# Altium PCB PCB.PcbDoc (part 2 of 2)
Units mm, origin at the board's own origin, x right, y up, seen from the top; angles counter-clockwise.
Board outline 200 x 191 mm, 2 copper layers (Top Layer, Bottom Layer); 381 components, 542 nets, 2307 pads, 23 vias.
Unrouted connection lines stored in the file: 1334.
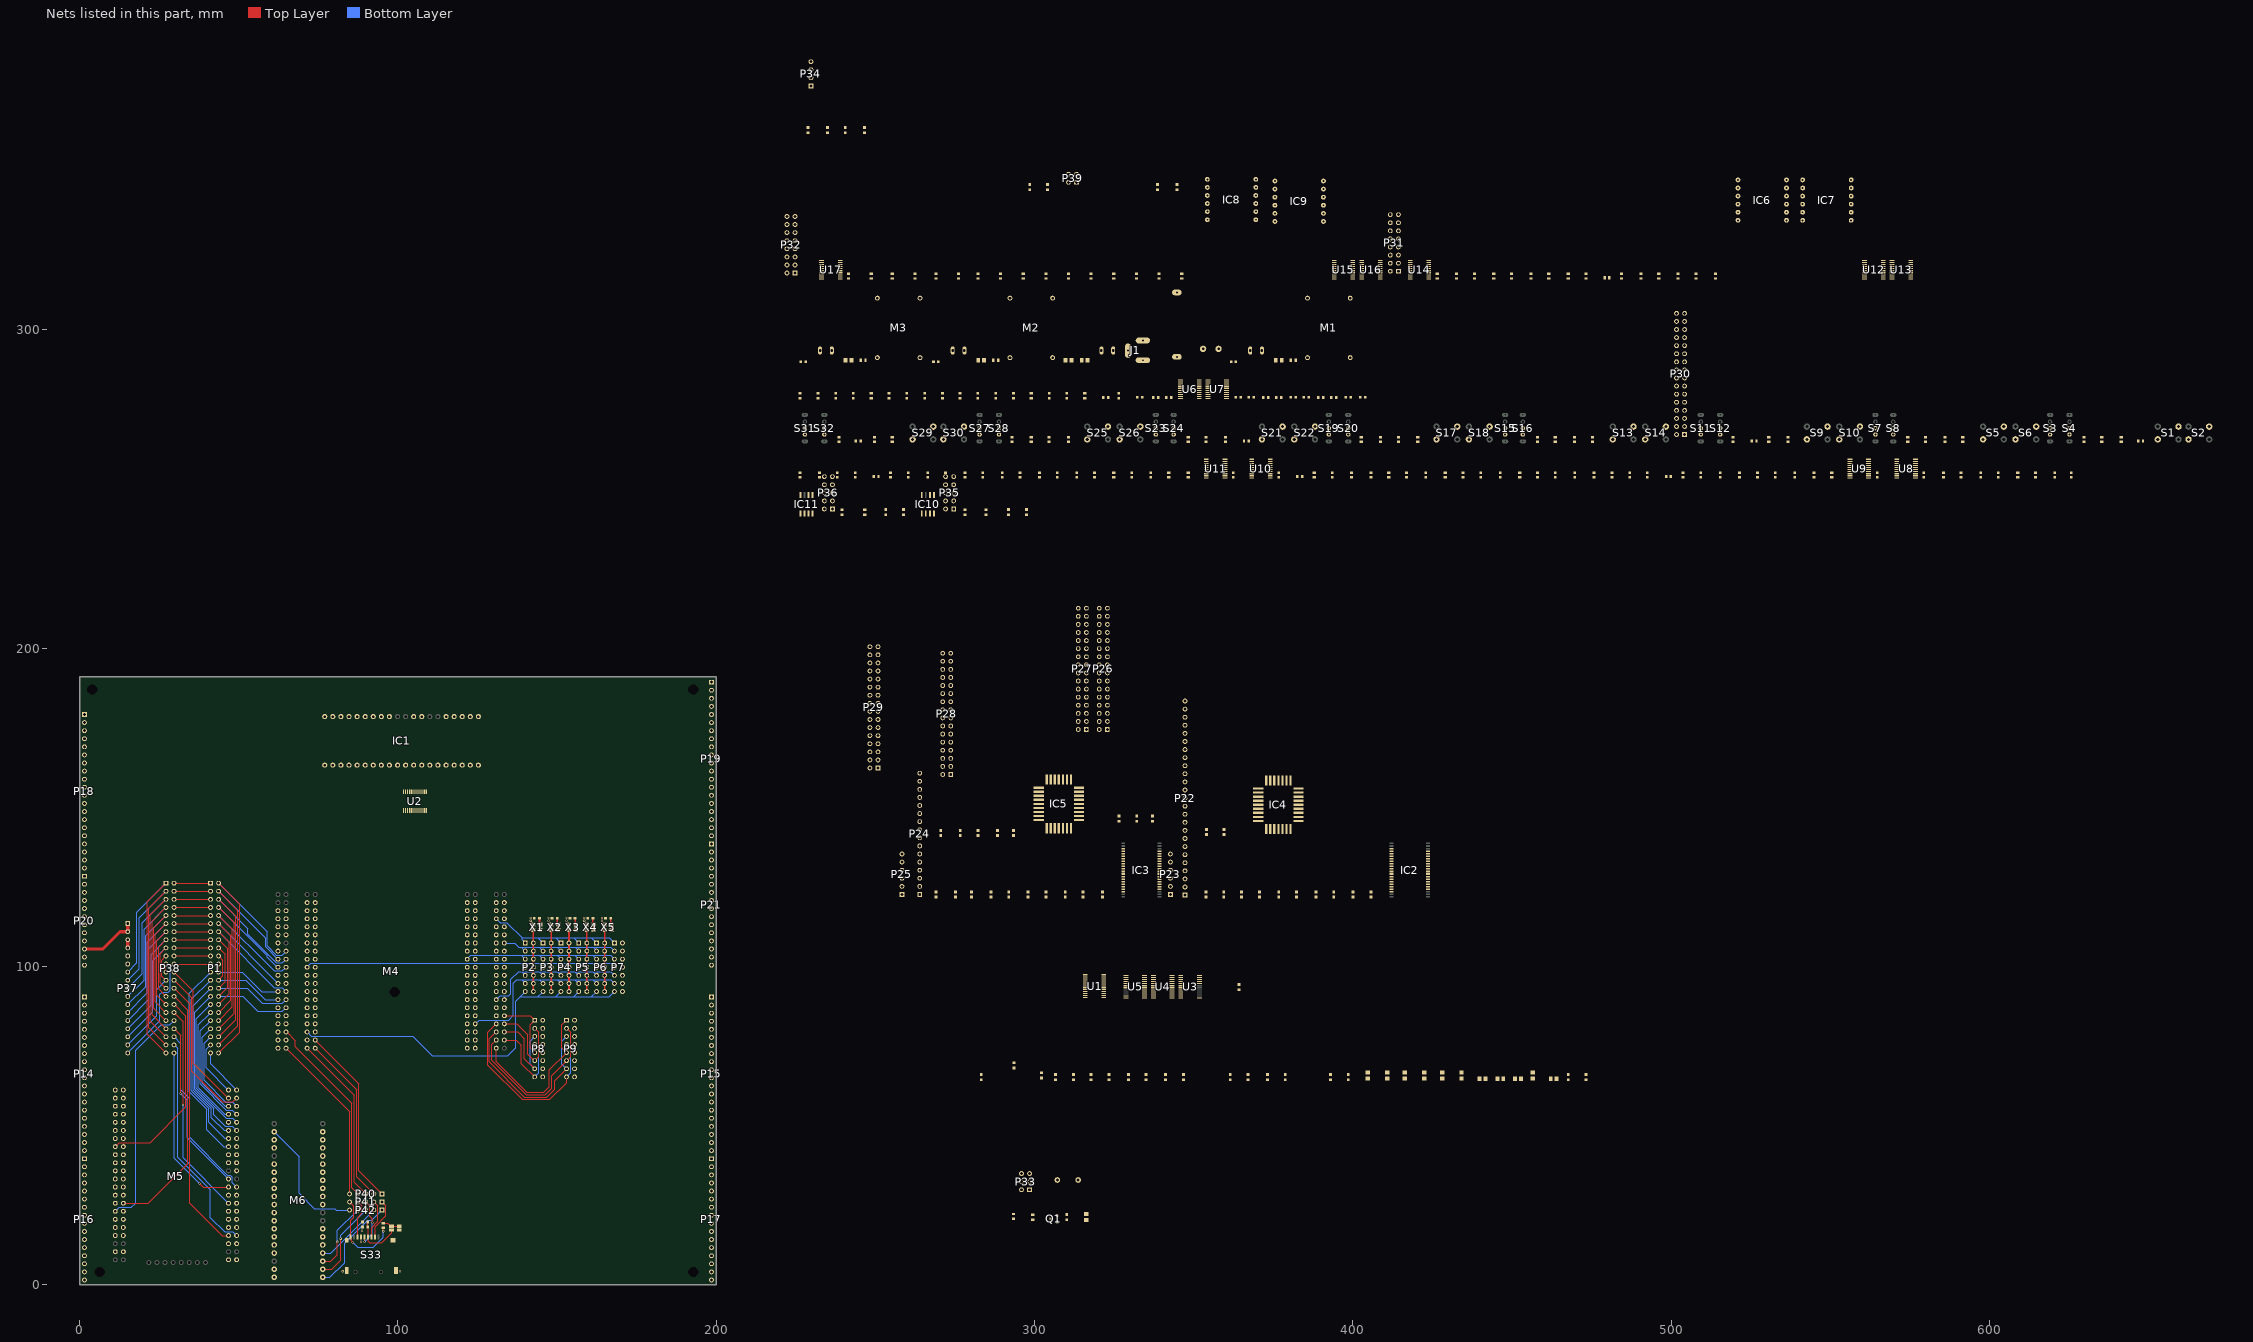
[diagram p2: the nets of this part, all layers, seen from the top]

## Part data
C2 C4 C5 C7 C9 C22 C23 C24 C25 C77: "Multilayer ceramic capacitor", LCSC part=C1711, Package=0805, V=50
C10 C11 C12 C13 C14: library part "Ceramic capacitor", "Multilayer ceramic capacitor", LCSC part=C14663, Package=0603, V=50
C15 C29 C31 C32 C34 C36 C38 C41 C43 C45 C78 C80 C82 C83 C87 C88 C90: "Multilayer ceramic capacitor", LCSC part=C1691, Package=0603, V=6.3
C16 C28 C30 C33 C35 C37 C39 C40 C42 C44 C52 C53 C54 C55 C62 C63 C64 C65 C69 C70 C74 C75 C79 C81 C84 C85 C86 C89 C91: "Multilayer ceramic capacitor", LCSC part=C14663, Package=0603, V=50
C17 C18 C19 C20 C21: "Multilayer ceramic capacitor", LCSC part=C45783, Package=0805, V=25
C26 C27: "Multilayer ceramic capacitor", LCSC part=C1710, Package=0805, V=50
C46 C47 C48 C49 C56 C57 C58 C59 C66 C67 C71 C72 C76: "Multilayer ceramic capacitor", LCSC part=C59461, Package=0603, V=6.3
C50 C51 C60 C61 C68 C73: "Multilayer ceramic capacitor", LCSC part=C1591, Package=0603, V=50
D1 D2 D3: library part LED2, "Green LED 0603", Package=0603
D4 D5 D6 D7 D8 D9 D10 D11 D12 D13 D14 D15 D16 D17 D18 D19 D20 D21 D22 D23 D24 D25 D26 D27 D28 D29 D30 D31 D32 D33 D34 D35 D36 D37 D38 D39 D40 D41 D42 D43 D44 D45 D46 D47 D48 D49 D50 D51: library part LED2, "Red LED 0603", LCSC part=C2286, Package="0603 - 3.2X1.6X1.1"
IC2 IC3: MFR=ISSI, MFR part=IS61WV5128BLL-10TLI, Package="TSOP II - 44pin", Temp="−40 to +85 °C"
IC4 IC5: "Parallel NOR FLASH SST39VF0xx"
IC6 IC7 IC8 IC9: "Seven segment display x 4 digits with 4 decimal points and hours/minutes divider."
IC10 IC11: "NOR flash memory / SPI"
J1: "Low Voltage Power Supply Connector", Publisher="Altium Limited"
LS1: "Magnetic Transducer Buzzer", ComponentLink1Description="Manufacturer Link", ComponentLink1URL=http://www.megastar.com/linecard/buzzmode/index.php, DatasheetVersion=17-Dec-2003, LatestRevisionDate=17-Dec-2003, LatestRevisionNote="Schematic revised, PCB Footprint replaced.", PackageDescription="Magnetic Transducer Buzzer", PackageReference=ABSM-1574, Published=24-Mar-1999, Publisher="Altium Limited"
M1 M2 M3: library part "Module regulable Step Down converter", "Module regulable Step Down converter"
M4: library part Lattice_MachXO3LF_starter_kit, "FPGA development board - MachXO3LF Starter Kit"
M5: "Module DevEBox STM32H7XX_M  / V2.0  / SN: 1907"
M6: "Module Black Pill V3.0 / STM32F4xx"
P1 P38: "Header, 22-Pin, Dual row", LatestRevisionDate=17-Jul-2002, LatestRevisionNote="Re-released for DXP Platform.", Publisher="Altium Limited"
P2 P3 P4 P5 P6 P7: "Header, 7-Pin, Dual row", LatestRevisionDate=17-Jul-2002, LatestRevisionNote="Re-released for DXP Platform.", Publisher="Altium Limited"
P8 P9 P31 P32: "Header, 8-Pin, Dual row", LatestRevisionDate=17-Jul-2002, LatestRevisionNote="Re-released for DXP Platform.", Publisher="Altium Limited"
P14 P15 P18 P19: "Header, 20-Pin", LatestRevisionDate=17-Jul-2002, LatestRevisionNote="Re-released for DXP Platform.", Publisher="Altium Limited"
P16 P17 P21 P24: "Header, 16-Pin", LatestRevisionDate=17-Jul-2002, LatestRevisionNote="Re-released for DXP Platform.", Publisher="Altium Limited"
P20: "Header, 12-Pin", LatestRevisionDate=17-Jul-2002, LatestRevisionNote="Re-released for DXP Platform.", Publisher="Altium Limited"
P22: "Header, 25-Pin", LatestRevisionDate=17-Jul-2002, LatestRevisionNote="Re-released for DXP Platform.", Publisher="Altium Limited"
P23 P25: "Header, 6-Pin", LatestRevisionDate=17-Jul-2002, LatestRevisionNote="Re-released for DXP Platform.", Publisher="Altium Limited"
P26 P27 P28 P29 P30: "Header, 16-Pin, Dual row", LatestRevisionDate=17-Jul-2002, LatestRevisionNote="Re-released for DXP Platform.", Publisher="Altium Limited"
P33: "Header, 3-Pin, Dual row", LatestRevisionDate=17-Jul-2002, LatestRevisionNote="Re-released for DXP Platform.", Publisher="Altium Limited"
P34: "Header, 4-Pin", LatestRevisionDate=17-Jul-2002, LatestRevisionNote="Re-released for DXP Platform.", Publisher="Altium Limited"
P35 P36: "Header, 5-Pin, Dual row", LatestRevisionDate=17-Jul-2002, LatestRevisionNote="Re-released for DXP Platform.", Publisher="Altium Limited"
P37: "Header, 17-Pin", LatestRevisionDate=17-Jul-2002, LatestRevisionNote="Re-released for DXP Platform.", Publisher="Altium Limited"
P39: "Header, 2-Pin, Dual row", LatestRevisionDate=17-Jul-2002, LatestRevisionNote="Re-released for DXP Platform.", Publisher="Altium Limited"
P40 P41 P42: "Header, 5-Pin", LatestRevisionDate=17-Jul-2002, LatestRevisionNote="Re-released for DXP Platform.", Publisher="Altium Limited"
Q1: library part MOSFET-N, "N-Channel MOSFET", LCSC part=C20917, MFR="Alpha & Omega Semicon", Package=SOT-23-3L, MFR part=AO3400A
R1 R2 R3 R20 R21 R22 R23 R24 R25 R26 R27 R28 R29 R30 R31 R32 R33 R34 R35 R36 R37 R38 R39 R40 R41 R42 R43 R44 R45 R46 R47 R48 R49 R50 R51 R84 R85 R86 R87 R88 R89 R90 R91 R92 R93 R94 R95 R96 R97 R98 R99 R100 R101 R102 R103 R104 R105 R106 R107 R108 R109 R110 R111 R112 R113 R114 R115 R116 R117 R118 R119 R120 R121 R122: Package=0603
R4 R5 R6 R7 R8 R9 R10 R11 R12 R13 R14 R15 R16 R17 R18 R19 R52 R53 R54 R55 R56 R57 R58 R59 R60 R61 R62 R63 R64 R65 R66 R67 R68 R69 R70 R71 R72 R73 R74 R75 R76 R77 R78 R79 R80 R81 R82 R83: LCSC part=C22843, Package=0603
S1 S2 S5 S6 S9 S10 S13 S14 S17 S18 S21 S22 S25 S26 S29 S30: library part SW-PB, "Switch"
S3 S4 S7 S8 S11 S12 S15 S16 S19 S20 S23 S24 S27 S28 S31 S32: "SPDT Subminiature Toggle Switch, Right Angle Mounting, Vertical Actuation", ComponentLink1Description="Manufacturer Link", ComponentLink1URL=http://www.apem.com, DatasheetVersion=05-Dec-2000, LatestRevisionDate=17-Dec-2003, LatestRevisionNote="Schematic revised, PCB Footprint replaced.", PackageDescription="Switch; 4 Leads", PackageReference=TL36WW15050, Published=24-Mar-1999, Publisher="Altium Limited"
S33: library part "Micro SD", "Micro SD memory"
SJ1 SJ2: "Normally open solder jumper"
U1 U2 U3 U4 U5: "Octal Bus Transceiver And 3.3-V To 5-V Shifter With 3-State Outputs 24-TSSOP -40 to 85", Manufacturer_Name="Texas Instruments", Copyright="Copyright (C) 2025 Ultra Librarian. All rights reserved.", Manufacturer_Part_Number=SN74LVC4245APW, RefDes=RefDes, Type=Type
U6 U7 U8 U9 U10 U11 U12 U13 U14 U15 U16 U17: "8-ch, 1.65-V to 3.6-V buffers with 3-state outputs 20-TSSOP -40 to 125", Manufacturer_Name="Texas Instruments", Copyright="Copyright (C) 2026 Ultra Librarian. All rights reserved.", Datasheet=https://www.ti.com/lit/gpn/sn74lvc244a, Manufacturer_Part_Number=SN74LVC244APWR, RefDes=RefDes, Type=Type
X1 X2 X3 X4 X5: library part "Active oscillator"

## Free pads (board coordinates)
  round 1.524 hole 3.2 unplated: 2(4,187) 2(6.3,4) 2(99,92) 2(192.754,4) 2(192.754,187)

## Via types
v1: diameter 0.7, hole 0.3, Top Layer to Bottom Layer, tented both sides, 23 vias

## Nets (pads, with @x,y where several pads share a name; then routed paths per layer and width w, separated by ;. In a path a pad name is that pad's centre, name@x,y a point inside that pad or via, vN(x,y) a via of type N, cw(c..) or ccw(c..) an arc to the next point about the centre after c; other vN are vias at no path point)
A0_BIOS1: IC4.12 P27.30
A0_BIOS2: IC5.12 P29.30
A0_latch_3v: M4.J6_10 M5.J3_44 P19.20 U8.8
A1_BIOS1: IC4.11 P27.28
A1_BIOS2: IC5.11 P29.28
A1_latch_3v: IC2.3 IC3.3 M4.J6_7 M5.J3_43 P19.3 P22.25 P27.29 P29.29 U8.6
A2_BIOS1: IC4.10 P27.26
A2_BIOS2: IC5.10 P29.26
A2_latch_3v: IC2.4 IC3.4 M4.J6_14 M5.J3_42 P21.1 P22.24 P27.27 P29.27 U8.4
A3_BIOS1: IC4.9 P27.24
A3_BIOS2: IC5.9 P29.24
A3_latch_3v: IC2.5 IC3.5 M4.J6_9 M5.J3_41 P19.4 P22.23 P27.25 P29.25 U8.2
A4_BIOS1: IC4.8 P27.22
A4_BIOS2: IC5.8 P29.22
A4_latch_3v: IC2.6 IC3.6 M4.J6_16 M5.J3_40 P21.2 P22.22 P27.23 P29.23 U11.17
A5_BIOS1: IC4.7 P27.20
A5_BIOS2: IC5.7 P29.20
A5_latch_3v: IC2.7 IC3.7 M4.J6_13 M5.J3_39 P19.5 P22.21 P27.21 P29.21 U11.15
A6_BIOS1: IC4.6 P27.18
A6_BIOS2: IC5.6 P29.18
A6_latch_3v: IC2.16 IC3.16 M4.J6_18 M5.J3_38 P21.3 P22.20 P27.19 P29.19 U11.13
A7_BIOS1: IC4.5 P27.16
A7_BIOS2: IC5.5 P29.16
A7_latch_3v: IC2.17 IC3.17 M4.J6_15 M5.J3_37 P19.6 P22.19 P27.17 P29.17 U11.11
A8_BIOS1: IC4.27 P26.5
A8_BIOS2: IC5.27 P28.5
A8_latch_3v: IC2.18 IC3.18 M4.J6_20 M5.J3_36 P21.4 P22.18 P27.15 P29.15 U11.8
A9_BIOS1: IC4.26 P26.7
A9_BIOS2: IC5.26 P28.7
A9_latch_3v: IC2.19 IC3.19 M4.J6_19 M5.J3_35 P19.8 P22.17 P26.6 P28.6 U11.6
A10_BIOS1: IC4.23 P26.13
A10_BIOS2: IC5.23 P28.13
A10_latch_3v: IC2.20 IC3.20 M4.J6_24 M5.J3_34 P21.5 P22.16 P26.8 P28.8 U11.4
A11_BIOS1: IC4.25 P26.9
A11_BIOS2: IC5.25 P28.9
A11_latch_3v: IC2.26 IC3.26 M4.J6_23 M5.J3_33 P19.9 P22.15 P26.14 P28.14 U11.2
A12_BIOS1: IC4.4 P27.14
A12_BIOS2: IC5.4 P29.14
A12_latch_3v: IC2.27 IC3.27 M4.J6_26 M5.J3_32 P21.6 P22.14 P26.10 P28.10 U9.17
A13_BIOS1: IC4.28 P26.3
A13_BIOS2: IC5.28 P28.3
A13_latch_3v: IC2.28 IC3.28 M4.J6_25 M5.J3_31 P19.10 P22.13 P27.13 P29.13 U9.15
A14_BIOS1: IC4.29 P26.1
A14_BIOS2: IC5.29 P28.1
A14_latch_3v: IC2.29 IC3.29 M4.J6_28 M5.J3_29 P21.7 P22.12 P26.4 P28.4 U9.13
A15_BIOS1: IC4.3 P27.12
A15_BIOS2: IC5.3 P29.12
A15_latch_3v: IC2.30 IC3.30 M4.J6_27 M5.J3_28 P19.11 P22.11 P26.2 P28.2 U9.11
A16: IC1.38 U1.3
A16_3v: M4.J8_6 P15.18 U1.21
A16_BIOS1: IC4.2 P27.10
A16_BIOS2: IC5.2 P29.10
A16_latch_3v: IC2.38 IC3.38 M4.J6_30 M5.J3_27 P21.8 P22.10 P27.11 P29.11 U9.8
A17: IC1.37 U1.4
A17_3v: M4.J8_8 P15.19 U1.20
A17_BIOS1: IC4.30 P27.2
A17_BIOS2: IC5.30 P29.2
A17_latch_3v: IC2.39 IC3.39 M4.J6_29 M5.J3_26 P19.12 P22.9 P27.9 P29.9 U9.6
A18: IC1.36 U1.5
A18_3v: M4.J8_10 P15.20 U1.19
A18_BIOS1: IC4.1 P27.8
A18_BIOS2: IC5.1 P29.8
A18_latch_3v: IC2.40 IC3.40 M4.J6_36 M5.J3_25 P21.10 P22.8 P27.1 P29.1 U9.4
A19: IC1.35 U1.6
A19_3v: M4.J8_16 P17.2 U1.18
A19_latch_3v: IC2.41 IC3.41 M4.J6_33 M5.J3_23 P19.13 P22.7 P27.7 P29.7 U9.2
AD0: IC1.16 U2.3
AD0_3v: IC3.9 M4.J8_30 M5.J3_22 P17.8 P24.16 P29.31 P30.31 U2.21 U7.17
AD0_3v_sw: P30.32 R49.1
AD1: IC1.15 U2.4
AD1_3v: IC3.10 M4.J8_18 M5.J3_21 P17.3 P17.9 P24.15 P28.32 P30.29 U2.20 U7.15
AD1_3v_sw: P30.30 R45.1
AD2: IC1.14 U2.5
AD2_3v: IC3.13 M4.J8_29 M5.J3_20 P15.12 P24.14 P28.30 P30.27 U2.19 U7.13
AD2_3v_sw: P30.28 R41.1
AD3: IC1.13 U2.6
AD3_3v: IC3.14 M4.J8_25 M5.J3_19 P15.10 P24.13 P28.26 P30.25 U2.18 U7.11
AD3_3v_sw: P30.26 R37.1
AD4: IC1.12 U2.7
AD4_3v: IC3.31 M4.J8_23 M5.J3_18 P15.9 P24.12 P28.24 P30.23 U2.17 U7.8
AD4_3v_sw: P30.24 R33.1
AD5: IC1.11 U2.8
AD5_3v: IC3.32 M4.J8_24 M5.J3_17 P17.5 P24.11 P28.22 P30.21 U2.16 U7.6
AD5_3v_sw: P30.22 R29.1
AD6: IC1.10 U2.9
AD6_3v: IC3.35 M4.J8_19 M5.J3_16 P15.8 P24.10 P28.20 P30.19 U2.15 U7.4
AD6_3v_sw: P30.20 R25.1
AD7: IC1.9 U2.10
AD7_3v: IC3.36 M4.J8_17 M5.J3_13 P15.7 P24.9 P28.18 P30.17 U2.14 U7.2
AD7_3v_sw: P30.18 R21.1
AD8: IC1.8 U4.3
AD8_3v: IC2.9 M4.J8_15 M5.J3_12 P15.6 P24.8 P27.31 P30.15 U4.21 U6.17
AD8_3v_sw: P30.16 R48.1
AD9: IC1.7 U4.4
AD9_3v: IC2.10 M4.J8_13 M5.J3_11 P15.5 P24.7 P26.32 P30.13 U4.20 U6.15
AD9_3v_sw: P30.14 R44.1
AD10: IC1.6 U4.5
AD10_3v: IC2.13 M4.J8_9 M5.J2_10 P15.4 P24.6 P26.30 P30.11 U4.19 U6.13
AD10_3v_sw: P30.12 R40.1
AD11: IC1.5 U4.6
AD11_3v: IC2.14 M4.J8_5 M5.J2_9 P15.2 P24.5 P26.26 P30.9 U4.18 U6.11
AD11_3v_sw: P30.10 R36.1
AD12: IC1.4 U4.7
AD12_3v: IC2.31 M4.J8_3 M5.J2_12 P15.1 P24.4 P26.24 P30.7 U4.17 U6.8
AD12_3v_sw: P30.8 R32.1
AD13: IC1.3 U4.8
AD13_3v: IC2.32 M4.J6_4 M5.J2_11 P19.17 P24.3 P26.22 P30.5 U4.16 U6.6
AD13_3v_sw: P30.6 R28.1
AD14: IC1.2 U4.9
AD14_3v: IC2.35 M4.J6_3 M5.J2_14 P19.1 P24.2 P26.20 P30.3 U4.15 U6.4
AD14_3v_sw: P30.4 R24.1
AD15: IC1.39 U4.10
AD15_3v: IC2.36 M4.J8_4 M5.J2_15 P15.17 P24.1 P26.18 P30.1 U4.14 U6.2
AD15_3v_sw: P30.2 R20.1
ALE: IC1.25 U3.3
ALE_3v_PCLKT5_0: M4.J8_28 M5.J2_13 P17.7 U3.21 U10.11
B\H\E\: IC1.34 U1.7
B\H\E\_3v: P8.2 U1.17 U10.6
B\H\E\_latch_3v: M4.J6_8 P19.19
BIOS_C\E\_high_byte: P22.3 P26.16 U8.15
BIOS_C\E\_low_byte: P22.4 P28.16 U8.17
C\E\_BIOS1: IC4.22 P26.15
C\E\_BIOS2: IC5.22 P28.15
CPU_CLK: IC1.19 U5.5
CPU_CLK_3v: P9.4 U5.19
CPU_RESET: IC1.21 U5.4
CPU_RESET_3v: P8.8 U5.20
D0_BIOS1: IC4.13 P27.32
D0_BIOS2: IC5.13 P29.32
D1_BIOS1: IC4.14 P26.31
D1_BIOS2: IC5.14 P28.31
D2_BIOS1: IC4.15 P26.29
D2_BIOS2: IC5.15 P28.29
D3_BIOS1: IC4.17 P26.25
D3_BIOS2: IC5.17 P28.25
D4_BIOS1: IC4.18 P26.23
D4_BIOS2: IC5.18 P28.23
D5_BIOS1: IC4.19 P26.21
D5_BIOS2: IC5.19 P28.21
D6_BIOS1: IC4.20 P26.19
D6_BIOS2: IC5.20 P28.19
D7_BIOS1: IC4.21 P26.17
D7_BIOS2: IC5.21 P28.17
FPGA1_MCU_STM32H750: M5.J2_30 P1.23 | length 63.5
  Bottom Layer w0.254: P1.23@41.131,98.235 34.5,91.603 34.5,60.7 40,55.2 40,48.7 45.28,43.42 M5.J2_30@46.77,43.42
FPGA2_MCU_STM32H750: M5.J2_32 P1.25 | length 57.7
  Bottom Layer w0.254: P1.25@41.131,95.695 35.1,89.663 35.1,60.9 40.6,55.4 40.6,51 45.627,45.973 46.757,45.973 M5.J2_32@46.77,45.96
FPGA3_MCU_STM32H750: M5.J2_34 P1.27 | length 52.3
  Bottom Layer w0.254: P1.27@41.131,93.155 35.7,87.723 35.7,61.1 41.4,55.4 41.4,52.5 45.4,48.5 M5.J2_34@46.77,48.5
FPGA4_MCU_STM32H750: M5.J2_33 P1.29 | length 50.9
  Bottom Layer w0.254: P1.29@41.131,90.615 36.208,85.691 36.208,61.392 42.1,55.5 42.1,53.5 45.8,49.8 48.01,49.8 M5.J2_33@49.31,48.5
FPGA5_MCU_STM32H750: M5.J2_35 P1.31 | length 45.2
  Bottom Layer w0.254: P1.31@41.131,88.075 36.716,83.659 36.716,61.684 46.1,52.3 48.05,52.3 M5.J2_35@49.31,51.04
FPGA6_MCU_STM32H750: M5.J2_38 P1.33 | length 38.1
  Bottom Layer w0.254: P1.33@41.131,85.535 37.3,81.703 37.3,61.9 45.62,53.58 M5.J2_38@46.77,53.58
FPGA7_MCU_STM32H750: M5.J2_37 P1.35 | length 36.6
  Bottom Layer w0.254: P1.35@41.131,82.995 37.9,79.763 37.9,63.1 46.1,54.9 47.99,54.9 M5.J2_37@49.31,53.58
FPGA8_MCU_STM32H750: M5.J2_40 P1.37 | length 29.5
  Bottom Layer w0.254: P1.37@41.131,80.455 38.5,77.823 38.5,63.3 45.68,56.12 M5.J2_40@46.77,56.12
FPGA9_MCU_STM32H750: M5.J2_39 P1.39 | length 28.1
  Bottom Layer w0.254: P1.39@41.131,77.915 39.1,75.883 39.1,64.2 45.9,57.4 48.03,57.4 M5.J2_39@49.31,56.12
FPGA10_MCU_STM32H750: M5.J2_44 P1.41 | length 17.6
  Bottom Layer w0.254: P1.41@41.131,75.375 39.8,74.043 39.8,68.17 M5.J2_44@46.77,61.2
FPGA11_MCU_STM32H750: M5.J2_43 P1.43 | length 15
  Bottom Layer w0.254: P1.43@41.131,72.835 41.131,69.379 M5.J2_43@49.31,61.2
FPGA-LCD_BACKLIGHT_PWM: P1.21 P38.22 | length 11.5
  Top Layer w0.254: P38.22@29.671,100.775 P1.21@41.131,100.775
FPGA-LCD_BLUE_BIT6: P1.1 P38.2 | length 11.5
  Top Layer w0.254: P38.2@29.671,126.175 P1.1@41.131,126.175
FPGA-LCD_BLUE_BIT7: P1.3 P38.4 | length 11.5
  Top Layer w0.254: P38.4@29.671,123.635 P1.3@41.131,123.635
FPGA-LCD_DE-FPC_PIN9: P1.7 P38.8 | length 11.5
  Top Layer w0.254: P38.8@29.671,118.555 P1.7@41.131,118.555
FPGA-LCD_HSYNC-FPC_PIN11: P1.11 P38.12 | length 11.5
  Top Layer w0.254: P38.12@29.671,113.475 P1.11@41.131,113.475
FPGA-LCD_MODE-FPC_PIN8: P1.5 P38.6 | length 11.5
  Top Layer w0.254: P38.6@29.671,121.095 P1.5@41.131,121.095
FPGA-LCD_PCLK-FPC_PIN37: P1.13 P38.14 | length 11.5
  Top Layer w0.254: P38.14@29.671,110.935 P1.13@41.131,110.935
FPGA-LCD_RESET-FPC_PIN44: P1.19 P38.20 | length 11.5
  Top Layer w0.254: P38.20@29.671,103.315 P1.19@41.131,103.315
FPGA-LCD_SHLR-FPC_PIN39: P1.15 P38.16 | length 11.5
  Top Layer w0.254: P38.16@29.671,108.395 P1.15@41.131,108.395
FPGA-LCD_UPDN-FPC_PIN40: P1.17 P38.18 | length 11.5
  Top Layer w0.254: P38.18@29.671,105.855 P1.17@41.131,105.855
FPGA-LCD_VSYNC-FPC_PIN10: P1.9 P38.10 | length 11.5
  Top Layer w0.254: P38.10@29.671,116.015 P1.9@41.131,116.015
GND: C1.2 C2.2 C3.2 C4.2 C5.2 C6.2 C7.2 C8.2 C9.2 C10.1 C11.1 C12.1 C13.1 C14.1 C15.1 C16.1 C17.1 C18.1 C19.1 C20.1 C21.1 C22.2 C23.2 C24.2 C25.2 C26.2 C27.2 C28.1 C29.1 C30.1 C31.1 C32.1 C33.1 C34.1 C35.1 C36.1 C37.1 C38.1 C39.1 C40.1 C41.1 C42.1 C43.1 C44.1 C45.1 C46.1 C47.1 C48.1 C49.1 C50.1 C51.1 C52.1 C53.1 C54.1 C55.1 C56.1 C57.1 C58.1 C59.1 C60.1 C61.1 C62.1 C63.1 C64.1 C65.1 C66.1 C67.1 C68.1 C69.1 C70.1 C71.1 C72.1 C73.1 C74.1 C75.1 C76.1 C77.2 C78.1 C79.1 C80.1 C81.1 C82.1 C83.1 C84.1 C85.1 C86.1 C87.1 C88.1 C89.1 C90.1 C91.1 D1.2 D2.2 D3.2 IC1.1 IC1.20 IC2.12 IC2.34 IC3.12 IC3.34 IC4.16 IC5.16 IC10.4 IC11.4 J1.2 J1.3 M1.1 M1.4 M2.1 M2.4 M3.1 M3.4 M4.J3_11 M4.J3_12 M4.J3_21 M4.J3_22 M4.J3_31 M4.J3_32 M4.J3_39 M4.J4_11 M4.J4_12 M4.J4_21 M4.J4_22 M4.J4_31 M4.J4_32 M4.J6_11 M4.J6_12 M4.J6_21 M4.J6_22 M4.J6_31 M4.J6_32 M4.J8_11 M4.J8_12 M4.J8_21 M4.J8_22 M4.J8_31 M5.J2_5 M5.J2_6 M5.J3_3 M5.J3_4 M6.19 M6.39 P7.2 P7.4 P7.6 P7.8 P7.10 P7.12 P7.14 P16.15 P16.16 P17.15 P17.16 P20.11 P20.12 P21.15 P21.16 P23.1 P23.2 P23.3 P23.4 P23.5 P23.6 P25.1 P25.2 P25.3 P25.4 P25.5 P25.6 P26.27 P26.28 P28.27 P28.28 P34.4 P37.5 P37.6 Q1.2 R4.1 R5.1 R6.1 R7.1 R8.1 R9.1 R10.1 R11.1 R12.1 R13.1 R14.1 R15.1 R16.1 R17.1 R18.1 R19.1 R22.2 R23.2 R26.2 R27.2 R30.2 R31.2 R34.2 R35.2 R38.2 R39.2 R42.2 R43.2 R46.2 R47.2 R50.2 R51.2 R52.1 R53.1 R54.1 R55.1 R56.1 R57.1 R58.1 R59.1 R60.1 R61.1 R62.1 R63.1 R64.1 R65.1 R66.1 R67.1 R68.1 R69.1 R70.1 R71.1 R72.1 R73.1 R74.1 R75.1 R76.1 R77.1 R78.1 R79.1 R80.1 R81.1 R82.1 R83.1 R117.2 S33.6 S33.10 SJ2.1 U1.11 U1.12 U1.13 U1.22 U2.11 U2.12 U2.13 U3.5 U3.6 U3.7 U3.8 U3.9 U3.10 U3.11 U3.12 U3.13 U3.22 U4.11 U4.12 U4.13 U5.2 U5.11 U5.12 U5.13 U5.14 U5.15 U5.16 U5.22 U6.1 U6.10 U6.19 U7.1 U7.10 U7.19 U8.1 U8.10 U8.19 U9.1 U9.10 U9.19 U10.1 U10.10 U10.19 U11.1 U11.10 U11.19 U12.1 U12.10 U12.19 U13.1 U13.10 U13.19 U14.1 U14.10 U14.19 U15.1 U15.10 U15.19 U16.1 U16.10 U16.19 U17.1 U17.10 U17.19 X1.2 X2.2 X3.2 X4.2 X5.2
  other v1: 82.65,4.275 100.65,4.275 88.4,13.525 88.75,17 141.725,114.375 147.325,114.375 152.925,114.375 158.525,114.375 164.125,114.375 141.725,115.25 147.325,115.25 152.925,115.25 158.525,115.25 164.125,115.25
I\N\T\A\: IC1.24 U3.4
I\N\T\A\_3v: P9.2 U3.20
INTR: IC1.18 U5.6
INTR_3v: P9.6 U5.18 U10.15
IO_A3: M4.J3_40 P20.8 P40.5 | length 54.1
  Top Layer w0.254: M4.J3_40@64.856,74.36 84.82,54.396 P40.5@84.82,28.565
IO_A4: M4.J3_38 P20.7 P33.1
IO_A5: M4.J3_36 P20.6 P40.4 | length 60.3
  Top Layer w0.254: M4.J3_36@64.856,79.44 65.06,79.44 67.75,76.75 67.75,74.75 85.5,57 85.5,30.425 P40.4@87.36,28.565
IO_A10: M4.J3_27 P1.20 P1.26 P18.10 U14.4 | length 29.9
  Top Layer w0.254: P1.26@43.671,95.695 45,97.023 45,101.986 P1.20@43.671,103.315
  Bottom Layer w0.254: P1.26@43.671,95.695 52.205,95.695 58.3,89.6 M4.J3_27@62.316,89.6
IO_B1: M4.J8_35 P9.5 P9.13 P15.14 | length 55.7
  Top Layer w0.16: M4.J8_35@130.896,79.44 128.75,77.294 128.75,70 139.75,59 146.75,59 149.25,61.5 149.25,64.17 P9.13@152.96,67.88
  Bottom Layer w0.16: P9.13@152.96,67.88 151.5,69.34 151.5,76.58 P9.5@152.96,78.04
IO_B4: M4.J3_37 P18.14 U14.13
IO_B5: M4.J3_35 P18.13 U14.11
IO_B6: M4.J3_33 P18.12 U14.8
IO_B7: M4.J3_34 P20.5 U15.2
IO_B9: M4.J3_30 P1.16 P1.30 P20.4 U13.17 | length 43.7
  Top Layer w0.254: P1.30@43.671,90.615 46.5,93.443 46.5,105.566 P1.16@43.671,108.395
  Bottom Layer w0.254: P1.30@43.671,90.615 51.197,90.615 55.911,85.9 63.696,85.9 M4.J3_30@64.856,87.06
IO_B12: M4.J3_6 P18.15 U14.15
IO_B16: M4.J4_40 P16.12 P40.2 | length 53.4
  Top Layer w0.254: M4.J4_40@74,74.36 87,61.36 87,34.005 P40.2@92.44,28.565
IO_C1: M4.J8_33 P9.7 P9.15 P15.13 | length 58.5
  Top Layer w0.16: M4.J8_33@130.896,81.98 128.25,79.334 128.25,69 139,58.25 147.75,58.25 152.96,63.46 P9.15@152.96,65.34
  Bottom Layer w0.16: P9.15@152.96,65.34 154.25,66.63 154.25,74.21 P9.7@152.96,75.5
IO_C2: M4.J8_32 P8.1 P8.9 | length 21.5
  Top Layer w0.16: M4.J8_32@133.436,84.52 141.56,84.52 P8.1@142.96,83.12 141.5,81.66 141.5,74.42 P8.9@142.96,72.96
IO_C4: M4.J3_26 P1.14 P1.32 P20.2 U13.13 | length 54.6
  Top Layer w0.254: P1.32@43.671,88.075 47.008,91.411 47.008,107.598 P1.14@43.671,110.935
  Bottom Layer w0.254: P1.14@43.671,110.935 61.206,93.4 63.596,93.4 M4.J3_26@64.856,92.14
IO_C5: M4.J3_23 P1.12 P1.34 P18.8 U12.17 | length 57.6
  Top Layer w0.254: P1.34@43.671,85.535 47.516,89.379 47.516,109.63 P1.12@43.671,113.475
  Bottom Layer w0.254: P1.12@43.671,113.475 43.671,113.4 62.316,94.755 M4.J3_23@62.316,94.68
IO_C7: M4.J3_20 P1.10 P1.36 P18.20 U13.8 | length 65.5
  Top Layer w0.254: P1.36@43.671,82.995 48.024,87.347 48.024,111.662 P1.10@43.671,116.015
  Bottom Layer w0.254: P1.10@43.671,116.015 61.069,98.617 63.713,98.617 M4.J3_20@64.856,99.76
IO_C12: M4.J3_7 M5.J2_25 P18.2 U12.4
IO_C15: M4.J4_36 P16.10 P39.2
IO_D3: M4.J8_36 P8.5 P8.13 P17.11 | length 29.3
  Top Layer w0.16: M4.J8_36@133.436,79.44 137.56,79.44 139.75,77.25 139.75,71.09 P8.13@142.96,67.88
  Bottom Layer w0.16: P8.13@142.96,67.88 141.5,69.34 141.5,76.58 P8.5@142.96,78.04
IO_D6: M4.J3_24 P20.1 U13.11
IO_D7: M4.J3_19 P1.8 P1.38 P18.7 U12.15 | length 68.8
  Top Layer w0.254: P1.38@43.671,80.455 48.532,85.315 48.532,113.694 P1.8@43.671,118.555
  Bottom Layer w0.254: P1.8@43.671,118.555 58.9,103.326 58.9,102.9 62.04,99.76 M4.J3_19@62.316,99.76
IO_D8: M4.J3_18 P1.6 P1.40 P18.19 U13.6 | length 78.6
  Top Layer w0.254: P1.40@43.671,77.915 49.04,83.283 49.04,115.726 P1.6@43.671,121.095
  Bottom Layer w0.254: P1.6@43.671,121.095 52.876,111.89 52.876,110.123 61.843,101.157 63.713,101.157 M4.J3_18@64.856,102.3
IO_D9: M4.J3_29 P18.11 U14.6
IO_D10: M4.J3_10 M5.J2_28 P18.17 U13.2
IO_D14: M4.J4_37 M6.17 P14.15 U17.13
IO_E3: M4.J8_37 P9.3 P9.11 P15.15 | length 52.9
  Top Layer w0.16: M4.J8_37@130.896,76.9 129.5,75.504 129.5,70.5 140.25,59.75 146.25,59.75 148.25,61.75 148.25,65.71 P9.11@152.96,70.42 154.25,71.71 154.25,79.29 P9.3@152.96,80.58
IO_E6: M4.J3_25 P1.22 P1.24 P18.9 U14.2 | length 23.7
  Top Layer w0.254: P1.24@43.671,98.235 43.671,99.505 ; P1.22@43.671,100.775 43.671,99.505 ; 43.676,99.5 43.671,99.505
  Bottom Layer w0.254: P1.24@43.671,98.235 51.065,98.235 57.16,92.14 M4.J3_25@62.316,92.14
IO_E7: M4.J3_17 P1.4 P1.42 P18.6 U12.13 | length 82.3
  Top Layer w0.254: P1.42@43.671,75.375 49.742,81.445 49.742,117.564 P1.4@43.671,123.635
  Bottom Layer w0.254: P1.4@43.671,123.635 58.4,108.906 58.4,106.216 M4.J3_17@62.316,102.3
IO_E8: M4.J3_15 M5.J2_31 P18.5 U12.11
IO_E9: M4.J3_16 P1.2 P1.44 P18.18 U13.4 | length 92.4
  Top Layer w0.254: P1.44@43.671,72.835 50.25,79.413 50.25,119.596 P1.2@43.671,126.175
  Bottom Layer w0.254: P1.2@43.671,126.175 58.908,110.938 58.908,106.492 61.8,103.6 63.616,103.6 M4.J3_16@64.856,104.84
IO_E10: M4.J3_9 M5.J2_27 P18.3 U12.6
IO_E11: M4.J3_8 M5.J2_26 P18.16 U14.17
IO_E14: M4.J4_34 M6.23 P16.9
IO_E15: M4.J4_30 M6.24 P16.8
IO_E16: M4.J4_33 M6.16 P14.13 U17.11
IO_F3: M4.J8_38 P8.7 P8.15 P17.12 | length 28.9
  Top Layer w0.16: M4.J8_38@133.436,76.9 137.1,76.9 138.75,75.25 138.75,69.5 142.91,65.34 P8.15@142.96,65.34
  Bottom Layer w0.16: P8.15@142.96,65.34 144.25,66.63 144.25,74.21 P8.7@142.96,75.5
IO_F5: M4.J8_39 P9.1 P9.9 P15.16 | length 49.9
  Top Layer w0.16: M4.J8_39@130.896,74.36 130.896,70.104 140.5,60.5 145.75,60.5 147.5,62.25 147.5,67.5 P9.9@152.96,72.96 151.5,74.42 151.5,81.66 P9.1@152.96,83.12
IO_F7: M4.J3_28 P1.18 P1.28 P20.3 U13.15 | length 38.1
  Top Layer w0.254: P1.28@43.671,93.155 45.75,95.233 45.75,103.776 P1.18@43.671,105.855
  Bottom Layer w0.254: P1.28@43.671,93.155 52.645,93.155 57.4,88.4 63.656,88.4 M4.J3_28@64.856,89.6
IO_F8: M4.J3_5 M5.J2_23 P18.1 U12.2
IO_F9: M4.J3_13 M5.J2_29 P18.4 U12.8
IO_F14: M4.J4_38 P16.11 P40.1 | length 57
  Top Layer w0.254: M4.J4_38@74,76.9 87.75,63.15 87.75,35.795 P40.1@94.98,28.565
IO_F15: M4.J4_28 M6.26 P16.7
IO_F16: M4.J4_29 M6.15 P14.12 U17.8
IO_G3: M4.J8_34 P8.3 P8.11 P17.10 | length 29.1
  Top Layer w0.16: M4.J8_34@133.436,81.98 137.27,81.98 140.75,78.5 140.75,72.5 142.83,70.42 P8.11@142.96,70.42 144.25,71.71 144.25,79.29 P8.3@142.96,80.58
IO_G14: M4.J4_39 P14.16 P40.3 | length 53.4
  Top Layer w0.254: M4.J4_39@71.46,74.36 86.25,59.57 86.25,32.215 P40.3@89.9,28.565
IO_G15: M4.J4_26 M6.27 P16.6 U16.17
IO_G16: M4.J4_27 M6.14 P14.11 U17.6
IO_H15: M4.J4_24 M6.28 P16.5 U16.15
IO_H16: M4.J4_25 M6.13 P14.10 U17.4
IO_J14: M4.J4_18 M6.30 P16.3 U16.11
IO_J15: M4.J4_20 M6.29 P16.4 U16.13
IO_J16: M4.J4_23 M6.12 P14.9 U17.2
IO_K12: M4.J4_3 M6.5 P14.1 U15.4
IO_K13: M4.J4_4 M6.37 P14.17 U17.15
IO_K14: M4.J4_15 M6.10 P14.6 U15.15
IO_K15: M4.J4_17 M6.11 P14.7 U15.17
IO_K16: M4.J4_16 M6.31 P16.2 U16.8
IO_L14: M4.J4_7 M6.7 P14.3 U15.8
IO_L15: M4.J4_13 P14.5 U15.13
IO_L16: M4.J4_14 M6.32 P16.1 U16.6
IO_M14: M4.J4_5 M6.6 P14.2 U15.6
IO_M15: M4.J4_9 P14.4 U15.11
IO_M16: M4.J4_10 M6.33 P14.20 U16.4
IO_N14: M4.J4_6 M6.35 P14.18 U17.17
IO_N16: M4.J4_8 M6.34 P14.19 U16.2
IO_R4: M4.J6_37 P19.15 P34.1
IO_T3: M4.J6_39 P19.16 P34.2
IO_T4: M4.J6_40 P21.12 P34.3
L_GPLLT_IN: M4.J8_27 P2.9 P3.9 P4.9 P5.9 P6.9 P7.9 P15.11 | length 52.2
  Bottom Layer w0.35: M4.J8_27@130.896,89.6 132.087,90.791 134.791,90.791 135.5,91.5 135.5,96 137.899,98.399 138.821,98.399 ; P2.9@140,97.22 138.821,98.399 ; P3.9@145.6,97.22 144.421,98.399 ; P4.9@151.2,97.22 150.021,98.399 ; P5.9@156.8,97.22 155.621,98.399 ; P6.9@162.4,97.22 161.221,98.399 ; P7.9@168,97.22 166.821,98.399 161.221,98.399 ; 138.821,98.399 144.421,98.399 ; 144.421,98.399 150.021,98.399 ; 150.021,98.399 155.621,98.399 ; 155.621,98.399 161.221,98.399
LCD_BACKLIGHT_PWM: P37.17 P38.21 P38.23 | length 37.6
  Top Layer w0.254: P38.23@27.131,98.235 P38.21@27.131,100.775
  Bottom Layer w0.254: P37.17@15.131,72.835 25.25,82.953 25.25,91.25 25.9,91.9 27.8,91.9 28.4,92.5 28.4,99.506 P38.21@27.131,100.775
LCD_BLUE_BIT6: P37.7 P38.1 P38.43 | length 91.1
  Top Layer w0.254: 21.235,98.235 21.25,98.25 ; P38.43@27.131,72.835 21.25,78.716 21.25,98.25 ; P38.1@27.131,126.175 21.25,120.293 21.25,98.25
  Bottom Layer w0.254: P37.7@15.131,98.235 18,101.103 18,117.043 P38.1@27.131,126.175
LCD_BLUE_BIT7: P37.8 P38.3 P38.41 | length 85.6
  Top Layer w0.254: P38.41@27.131,75.375 27.125,75.375 21.758,80.742 21.758,118.261 P38.3@27.131,123.635
  Bottom Layer w0.254: P37.8@15.131,95.695 18.75,99.313 18.75,115.253 P38.3@27.131,123.635
LCD_DE-FPC_PIN9: P37.10 P38.7 P38.37 | length 74.6
  Top Layer w0.254: P38.37@27.131,80.455 22.774,84.812 22.774,114.197 P38.7@27.131,118.555
  Bottom Layer w0.254: P37.10@15.131,90.615 20.258,95.741 20.258,111.681 P38.7@27.131,118.555
LCD_HSYNC-FPC_PIN11: P37.12 P38.11 P38.33 | length 63.6
  Top Layer w0.254: P38.33@27.131,85.535 23.79,88.876 23.79,110.133 P38.11@27.131,113.475
  Bottom Layer w0.254: P37.12@15.131,85.535 21.274,91.677 21.274,107.617 P38.11@27.131,113.475
LCD_MODE-FPC_PIN8: P37.9 P38.5 P38.39 | length 80.1
  Top Layer w0.254: P38.39@27.131,77.915 22.266,82.78 22.266,116.229 P38.5@27.131,121.095
  Bottom Layer w0.254: P37.9@15.131,93.155 19.75,97.773 19.75,113.713 P38.5@27.131,121.095
LCD_PCLK-FPC_PIN37: P37.13 P38.13 P38.31 | length 58.1
  Top Layer w0.254: P38.31@27.131,88.075 24.298,90.908 24.298,108.101 P38.13@27.131,110.935
  Bottom Layer w0.254: P37.13@15.131,82.995 21.782,89.645 21.782,105.585 P38.13@27.131,110.935
LCD_RESET-FPC_PIN44: P37.16 P38.19 P38.25 | length 34
  Top Layer w0.254: P38.25@27.131,95.695 25.822,97.004 25.822,102.005 P38.19@27.131,103.315
  Bottom Layer w0.254: P37.16@15.131,75.375 24.25,84.493 24.25,92.75 27.131,95.631 P38.25@27.131,95.695
LCD_SHLR-FPC_PIN39: P37.14 P38.15 P38.29 | length 52.6
  Top Layer w0.254: P38.29@27.131,90.615 24.806,92.94 24.806,106.069 P38.15@27.131,108.395
  Bottom Layer w0.254: P37.14@15.131,80.455 22.5,87.823 22.5,103.763 P38.15@27.131,108.395
LCD_UPDN-FPC_PIN40: P37.15 P38.17 P38.27 | length 47.1
  Top Layer w0.254: P38.27@27.131,93.155 25.314,94.972 25.314,104.037 P38.17@27.131,105.855
  Bottom Layer w0.254: P37.15@15.131,77.915 23.008,85.791 23.008,101.731 P38.17@27.131,105.855
LCD_VSYNC-FPC_PIN10: P37.11 P38.9 P38.35 | length 69.1
  Top Layer w0.254: P38.35@27.131,82.995 23.282,86.844 23.282,112.165 P38.9@27.131,116.015
  Bottom Layer w0.254: P37.11@15.131,88.075 20.766,93.709 20.766,109.649 P38.9@27.131,116.015
LEVEL_SHIFT_DIR: M4.J6_6 P19.18 U2.2 U4.2
LEVEL_SHIFT_O\E\: M4.J6_5 P19.2 U2.22 U4.22
M/I\O\: IC1.28 U1.10
M/I\O\_3v: P8.4 U1.14 U10.8
MCU-LCD_BACKLIGHT_PWM: M5.J2_20 P38.44 | length 53.9
  Top Layer w0.254: v1(37.7,31.8) 38.78,30.72 M5.J2_20@46.77,30.72
  Bottom Layer w0.254: P38.44@29.671,72.835 29.671,39.829 v1(37.7,31.8)
MCU-LCD_BLUE_BIT6: M5.J2_42 P38.24 | length 46.7
  Top Layer w0.254: P38.24@29.671,98.235 35.75,92.156 35.75,69.68 M5.J2_42@46.77,58.66
MCU-LCD_BLUE_BIT7: M5.J2_41 P38.26 | length 49.5
  Top Layer w0.254: P38.26@29.671,95.695 35.2,90.166 35.2,67.05 44.75,57.5 48.15,57.5 M5.J2_41@49.31,58.66
MCU-LCD_DE-FPC_PIN9: M5.J3_15 P38.30 | length 79.8
  Top Layer w0.254: M5.J3_15@13.75,25.64 21.64,25.64 34,38 34,86.286 P38.30@29.671,90.615
MCU-LCD_HSYNC-FPC_PIN11: M5.J2_16 P38.34 | length 67
  Top Layer w0.254: P38.34@29.671,85.535 32.5,82.706 v1(32.5,56.5)
  Bottom Layer w0.254: v1(32.5,56.5) 32.5,39.91 M5.J2_16@46.77,25.64
MCU-LCD_MODE-FPC_PIN8: M5.J2_8 P38.28 | length 85.9
  Top Layer w0.254: P38.28@29.671,93.155 34.6,88.226 34.6,25.65 44.77,15.48 M5.J2_8@46.77,15.48
MCU-LCD_PCLK-FPC_PIN37: M5.J3_14 P38.36 | length 71.4
  Bottom Layer w0.254: M5.J3_14@11.21,23.1 12.51,24.4 16.3,24.4 17.6,25.7 17.6,73.7 25.578,81.678 28.355,81.678 P38.36@29.671,82.995
MCU-LCD_RESET-FPC_PIN44: M5.J2_7 P38.42 | length 69.5
  Bottom Layer w0.254: P38.42@29.671,75.375 30.802,74.244 30.802,65.302 30.8,65.3 30.8,40.1 41.1,29.8 41.1,21.15 45.55,16.7 48.09,16.7 M5.J2_7@49.31,15.48
MCU-LCD_SHLR-FPC_PIN39: M5.J2_22 P38.38 | length 54.3
  Top Layer w0.254: P38.38@29.671,80.455 31.7,78.426 v1(31.7,60.1)
  Bottom Layer w0.254: v1(31.7,60.1) 33.8,58 33.8,46.23 M5.J2_22@46.77,33.26
MCU-LCD_UPDN-FPC_PIN40: M5.J2_19 P38.40 | length 55.9
  Bottom Layer w0.254: P38.40@29.671,77.915 31.843,75.743 31.843,61.257 34.6,58.5 34.6,46.3 46.4,34.5 47.3,34.5 48,33.8 48,32.03 M5.J2_19@49.31,30.72
MCU-LCD_VSYNC-FPC_PIN10: M5.J3_30 P38.32 | length 61.1
  Top Layer w0.254: M5.J3_30@11.21,43.42 12.49,44.7 22.2,44.7 33.4,55.9 33.4,84.346 P38.32@29.671,88.075
micro_sd_CARD_DETECT: M6.22 P42.5 | length 40.6
  Bottom Layer w0.254: M6.22@61.13,48.09 69,40.22 69,28.75 73.776,23.974 80.075,23.974 80.564,23.485 P42.5@84.82,23.485
micro_sd_CS: M6.1 P42.1 | length 30.9
  Bottom Layer w0.254: M6.1@76.37,2.37 78.62,2.37 83.25,7 83.25,13 90.481,20.231 91.726,20.231 P42.1@94.98,23.485
micro_sd_MISO: M6.3 P42.4 | length 22.1
  Top Layer w0.254: M6.3@76.37,7.45 78.95,7.45 81,9.5 v1(81,13.5)
  Bottom Layer w0.254: v1(81,13.5) 81,17.125 P42.4@87.36,23.485
micro_sd_MOSI: M6.4 P42.2 | length 21.7
  Bottom Layer w0.254: M6.4@76.37,9.99 78.945,9.99 P42.2@92.44,23.485
micro_sd_SCK: M6.2 P42.3 | length 25.8
  Top Layer w0.254: M6.2@76.37,4.91 79.16,4.91 82,7.75 v1(82,14.5)
  Bottom Layer w0.254: v1(82,14.5) 82,15.585 P42.3@89.9,23.485
NetC3_1: C3.1 C5.1 L1.2 M1.2 M2.2 M3.2
NetC4_1: C4.1 F1.2 L1.1
NetD1_1: D1.1 R1.1
NetD2_1: D2.1 R2.1
NetD3_1: D3.1 R3.1
NetD4_1: D4.1 U6.18
NetD4_2: D4.2 R4.2
NetD5_1: D5.1 U7.18
NetD5_2: D5.2 R5.2
NetD6_1: D6.1 U6.16
NetD6_2: D6.2 R6.2
NetD7_1: D7.1 U7.16
NetD7_2: D7.2 R7.2
NetD8_1: D8.1 U6.14
NetD8_2: D8.2 R8.2
NetD9_1: D9.1 U7.14
NetD9_2: D9.2 R9.2
NetD10_1: D10.1 U6.12
NetD10_2: D10.2 R10.2
NetD11_1: D11.1 U7.12
NetD11_2: D11.2 R11.2
NetD12_1: D12.1 U6.9
NetD12_2: D12.2 R12.2
NetD13_1: D13.1 U7.9
NetD13_2: D13.2 R13.2
NetD14_1: D14.1 U6.7
NetD14_2: D14.2 R14.2
NetD15_1: D15.1 U7.7
NetD15_2: D15.2 R15.2
NetD16_1: D16.1 U6.5
NetD16_2: D16.2 R16.2
NetD17_1: D17.1 U7.5
NetD17_2: D17.2 R17.2
NetD18_1: D18.1 U6.3
NetD18_2: D18.2 R18.2
NetD19_1: D19.1 U7.3
NetD19_2: D19.2 R19.2
NetD20_1: D20.1 U8.18
NetD20_2: D20.2 R52.2
NetD21_1: D21.1 U9.18
NetD21_2: D21.2 R53.2
NetD22_1: D22.1 U8.16
NetD22_2: D22.2 R54.2
NetD23_1: D23.1 U9.16
NetD23_2: D23.2 R55.2
NetD24_1: D24.1 U8.14
NetD24_2: D24.2 R56.2
NetD25_1: D25.1 U9.14
NetD25_2: D25.2 R57.2
NetD26_1: D26.1 U8.12
NetD26_2: D26.2 R58.2
NetD27_1: D27.1 U9.12
NetD27_2: D27.2 R59.2
NetD28_1: D28.1 U8.9
NetD28_2: D28.2 R60.2
NetD29_1: D29.1 U9.9
NetD29_2: D29.2 R61.2
NetD30_1: D30.1 U8.7
NetD30_2: D30.2 R62.2
NetD31_1: D31.1 U9.7
NetD31_2: D31.2 R63.2
NetD32_1: D32.1 U8.5
NetD32_2: D32.2 R64.2
NetD33_1: D33.1 U9.5
NetD33_2: D33.2 R65.2
NetD34_1: D34.1 U8.3
NetD34_2: D34.2 R66.2
NetD35_1: D35.1 U9.3
NetD35_2: D35.2 R67.2
NetD36_1: D36.1 U10.18
NetD36_2: D36.2 R68.2
NetD37_1: D37.1 U11.18
NetD37_2: D37.2 R69.2
NetD38_1: D38.1 U10.16
NetD38_2: D38.2 R70.2
NetD39_1: D39.1 U11.16
NetD39_2: D39.2 R71.2
NetD40_1: D40.1 U10.14
NetD40_2: D40.2 R72.2
NetD41_1: D41.1 U11.14
NetD41_2: D41.2 R73.2
NetD42_1: D42.1 U10.12
NetD42_2: D42.2 R74.2
NetD43_1: D43.1 U11.12
NetD43_2: D43.2 R75.2
NetD44_1: D44.1 U10.9
NetD44_2: D44.2 R76.2
NetD45_1: D45.1 U11.9
NetD45_2: D45.2 R77.2
NetD46_1: D46.1 U10.7
NetD46_2: D46.2 R78.2
NetD47_1: D47.1 U11.7
NetD47_2: D47.2 R79.2
NetD48_1: D48.1 U10.5
NetD48_2: D48.2 R80.2
NetD49_1: D49.1 U11.5
NetD49_2: D49.2 R81.2
NetD50_1: D50.1 U10.3
NetD50_2: D50.2 R82.2
NetD51_1: D51.1 U11.3
NetD51_2: D51.2 R83.2
NetF1_1: F1.1 J1.1
NetIC6_1: IC6.1 R92.2
NetIC6_2: IC6.2 R90.2
NetIC6_3: IC6.3 R98.2
NetIC6_4: IC6.4 R88.2
NetIC6_5: IC6.5 R96.2
NetIC6_6: IC6.6 P31.8
NetIC6_7: IC6.7 R86.2
NetIC6_8: IC6.8 P31.6
NetIC6_9: IC6.9 P31.4
NetIC6_10: IC6.10 R94.2
NetIC6_11: IC6.11 R84.2
NetIC6_12: IC6.12 P31.2
NetIC7_1: IC7.1 R93.2
NetIC7_2: IC7.2 R91.2
NetIC7_3: IC7.3 R99.2
NetIC7_4: IC7.4 R89.2
NetIC7_5: IC7.5 R97.2
NetIC7_6: IC7.6 P31.16
NetIC7_7: IC7.7 R87.2
NetIC7_8: IC7.8 P31.14
NetIC7_9: IC7.9 P31.12
NetIC7_10: IC7.10 R95.2
NetIC7_11: IC7.11 R85.2
NetIC7_12: IC7.12 P31.10
NetIC8_1: IC8.1 R108.2
NetIC8_2: IC8.2 R106.2
NetIC8_3: IC8.3 R114.2
NetIC8_4: IC8.4 R104.2
NetIC8_5: IC8.5 R112.2
NetIC8_6: IC8.6 P32.8
NetIC8_7: IC8.7 R102.2
NetIC8_8: IC8.8 P32.6
NetIC8_9: IC8.9 P32.4
NetIC8_10: IC8.10 R110.2
NetIC8_11: IC8.11 R100.2
NetIC8_12: IC8.12 P32.2
NetIC9_1: IC9.1 R109.2
NetIC9_2: IC9.2 R107.2
NetIC9_3: IC9.3 R115.2
NetIC9_4: IC9.4 R105.2
NetIC9_5: IC9.5 R113.2
NetIC9_6: IC9.6 P32.16
NetIC9_7: IC9.7 R103.2
NetIC9_8: IC9.8 P32.14
NetIC9_9: IC9.9 P32.12
NetIC9_10: IC9.10 R111.2
NetIC9_11: IC9.11 R101.2
NetIC9_12: IC9.12 P32.10
NetIC10_3: IC10.3 P35.6 R118.2
NetIC11_3: IC11.3 P36.6 R120.2
NetLS1_2: LS1.2 Q1.3
NetM6_36: M6.36 P39.1 P39.3
NetP2_2: P2.2 P2.4 P2.6 P2.8 P2.10 P2.12 P2.14 X1.3 | length 19.3
  Top Layer w0.5: P2.14@142.54,92.14 X1.3@142.54,111.475
NetP3_2: P3.2 P3.4 P3.6 P3.8 P3.10 P3.12 P3.14 X2.3 | length 19.3
  Top Layer w0.5: P3.14@148.14,92.14 X2.3@148.14,111.475
NetP4_2: P4.2 P4.4 P4.6 P4.8 P4.10 P4.12 P4.14 X3.3 | length 19.3
  Top Layer w0.5: P4.14@153.74,92.14 X3.3@153.74,111.475
NetP5_2: P5.2 P5.4 P5.6 P5.8 P5.10 P5.12 P5.14 X4.3 | length 19.3
  Top Layer w0.5: P5.14@159.34,92.14 X4.3@159.34,111.475
NetP6_2: P6.2 P6.4 P6.6 P6.8 P6.10 P6.12 P6.14 X5.3 | length 19.3
  Top Layer w0.5: P6.14@164.94,92.14 X5.3@164.94,111.475
NetP31_1: P31.1 U14.18
NetP31_3: P31.3 U14.16
NetP31_5: P31.5 U14.14
NetP31_7: P31.7 U14.12
NetP31_9: P31.9 U14.9
NetP31_11: P31.11 U14.7
NetP31_13: P31.13 U14.5
NetP31_15: P31.15 U14.3
NetP32_1: P32.1 U17.18
NetP32_3: P32.3 U17.16
NetP32_5: P32.5 U17.14
NetP32_7: P32.7 U17.12
NetP32_9: P32.9 U17.9
NetP32_11: P32.11 U17.7
NetP32_13: P32.13 U17.5
NetP32_15: P32.15 U17.3
NetP33_2: P33.2 P33.4 P33.6 R116.1
NetP41_1: P41.1 S33.2 | length 12.9
  Top Layer w0.254: S33.2@92.8,15.025 92.8,18.3 96.2,21.7 96.2,24.805 P41.1@94.98,26.025
NetP41_2: P41.2 S33.3 | length 12.4
  Top Layer w0.254: S33.3@91.7,15.025 91.7,17.95 93.7,19.95 93.7,24.765 P41.2@92.44,26.025
NetP41_3: P41.3 S33.5 | length 15.9
  Top Layer w0.254: v1(89.5,13.525) S33.5@89.5,15.025 ; P41.3@89.9,26.025 91.2,24.725 91.2,21.55 92,20.75 v1(92,19.5)
  Bottom Layer w0.254: v1(89.5,13.525) 92,16.025 v1(92,19.5)
NetP41_4: P41.4 S33.7 | length 12.1
  Top Layer w0.254: S33.7@87.3,15.025 87.3,21.125 88.6,22.425 88.6,24.785 P41.4@87.36,26.025
NetP41_5: P41.5 R122.1 S33.9 | length 28.4
  Top Layer w0.254: P41.5@84.82,26.025 86.1,24.745 86.1,21.225 85.1,20.225 S33.9@85.1,15.025 85.323,14.802 85.323,13.882 85.8,13.405 v1(85.8,13.325) ; v1(95.4,16.825) R122.1@95.4,17.875
  Bottom Layer w0.254: v1(85.8,13.325) 87.3,11.825 92.3,11.825 95.4,14.925 v1(95.4,16.825)
NetQ1_2: Q1.1 R116.2 R117.1
NetR20_2: R20.2 R22.1 S1.1 S3.2
NetR21_2: R21.2 R23.1 S2.1 S4.2
NetR24_2: R24.2 R26.1 S5.1 S7.2
NetR25_2: R25.2 R27.1 S6.1 S8.2
NetR28_2: R28.2 R30.1 S9.1 S11.2
NetR29_2: R29.2 R31.1 S10.1 S12.2
NetR32_2: R32.2 R34.1 S13.1 S15.2
NetR33_2: R33.2 R35.1 S14.1 S16.2
NetR36_2: R36.2 R38.1 S17.1 S19.2
NetR37_2: R37.2 R39.1 S18.1 S20.2
NetR40_2: R40.2 R42.1 S21.1 S23.2
NetR41_2: R41.2 R43.1 S22.1 S24.2
NetR44_2: R44.2 R46.1 S25.1 S27.2
NetR45_2: R45.2 R47.1 S26.1 S28.2
NetR48_2: R48.2 R50.1 S29.1 S31.2
NetR49_2: R49.2 R51.1 S30.1 S32.2
NetR84_1: R84.1 U12.18
NetR85_1: R85.1 U13.18
NetR86_1: R86.1 U12.16
NetR87_1: R87.1 U13.16
NetR88_1: R88.1 U12.14
NetR89_1: R89.1 U13.14
NetR90_1: R90.1 U12.12
NetR91_1: R91.1 U13.12
NetR92_1: R92.1 U12.9
NetR93_1: R93.1 U13.9
NetR94_1: R94.1 U12.7
NetR95_1: R95.1 U13.7
NetR96_1: R96.1 U12.5
NetR97_1: R97.1 U13.5
NetR98_1: R98.1 U12.3
NetR99_1: R99.1 U13.3
NetR100_1: R100.1 U15.18
NetR101_1: R101.1 U16.18
NetR102_1: R102.1 U15.16
NetR103_1: R103.1 U16.16
NetR104_1: R104.1 U15.14
NetR105_1: R105.1 U16.14
NetR106_1: R106.1 U15.12
NetR107_1: R107.1 U16.12
NetR108_1: R108.1 U15.9
NetR109_1: R109.1 U16.9
NetR110_1: R110.1 U15.7
NetR111_1: R111.1 U16.7
NetR112_1: R112.1 U15.5
NetR113_1: R113.1 U16.5
NetR114_1: R114.1 U15.3
NetR115_1: R115.1 U16.3
NetR122_2: R122.2 SJ1.2 SJ2.2 | length 5.4
  Top Layer w0.254: R122.2@95.4,19.375 96.8,19.375 97.75,18.425 SJ1.2@98,18.425 SJ2.2@100.4,18.425
NMI: IC1.17 U5.7
NMI_3v: P9.8 U5.17 U10.17
NOR_FLASH_1_CS: IC10.1 P8.10 P35.2 R119.2
NOR_FLASH_1_MISO: IC10.2 P8.12 P35.4
NOR_FLASH_1_MOSI: IC10.5 P8.14 P35.8
NOR_FLASH_1_SCK: IC10.6 P8.16 P35.10
NOR_FLASH_2_CS: IC11.1 P9.10 P36.2 R121.2
NOR_FLASH_2_MISO: IC11.2 P9.12 P36.4
NOR_FLASH_2_MOSI: IC11.5 P9.14 P36.8
NOR_FLASH_2_SCK: IC11.6 P9.16 P36.10
PCLKT1_0: M4.J4_19 P2.7 P3.7 P4.7 P5.7 P6.7 P7.7 P14.8 | length 106.1
  Bottom Layer w0.35: M4.J4_19@71.46,99.76 72.651,100.951 138.809,100.951 ; P2.7@140,99.76 138.809,100.951 ; P3.7@145.6,99.76 144.409,100.951 144.25,100.951 ; P4.7@151.2,99.76 150.009,100.951 ; P5.7@156.8,99.76 155.609,100.951 ; P6.7@162.4,99.76 161.209,100.951 ; P7.7@168,99.76 166.809,100.951 161.209,100.951 ; 138.809,100.951 144.25,100.951 ; 144.25,100.951 150.009,100.951 ; 150.009,100.951 155.609,100.951 ; 155.609,100.951 161.209,100.951
PCLKT2_0: M4.J6_34 P2.11 P3.11 P4.11 P5.11 P6.11 P7.11 P21.9 | length 64.3
  Bottom Layer w0.35: M4.J6_34@124.292,81.98 125.483,83.171 134.75,83.171 136.25,84.671 136.25,94.75 137.359,95.859 138.821,95.859 ; P2.11@140,94.68 138.821,95.859 ; P3.11@145.6,94.68 144.421,95.859 ; P4.11@151.2,94.68 150.021,95.859 ; P5.11@156.8,94.68 155.621,95.859 155.5,95.859 ; P6.11@162.4,94.68 161.221,95.859 ; P7.11@168,94.68 166.821,95.859 161.221,95.859 ; 138.821,95.859 144.421,95.859 ; 144.421,95.859 150.021,95.859 ; 150.021,95.859 155.5,95.859 ; 155.5,95.859 161.221,95.859
PCLKT2_1: M4.J6_17 P2.5 P3.5 P4.5 P5.5 P6.5 P7.5 P19.7 | length 55.7
  Bottom Layer w0.35: M4.J6_17@121.752,102.3 122.943,103.491 138.809,103.491 ; P2.5@140,102.3 138.809,103.491 ; P3.5@145.6,102.3 144.409,103.491 ; P4.5@151.2,102.3 150.009,103.491 ; P5.5@156.8,102.3 155.609,103.491 ; P6.5@162.4,102.3 161.209,103.491 ; P7.5@168,102.3 166.809,103.491 161.209,103.491 ; 138.809,103.491 144.409,103.491 ; 144.409,103.491 150.009,103.491 ; 150.009,103.491 155.609,103.491 ; 155.609,103.491 161.209,103.491
PCLKT3_0: M4.J8_7 P2.1 P3.1 P4.1 P5.1 P6.1 P7.1 P15.3 | length 51.5
  Bottom Layer w0.35: M4.J8_7@130.896,115 132.146,113.75 134.25,113.75 139,109 ; P2.1@140,107.38 139,108.38 139,109 ; P3.1@145.6,107.38 143.98,109 ; P4.1@151.2,107.38 149.58,109 ; P5.1@156.8,107.38 155.18,109 ; P6.1@162.4,107.38 160.78,109 ; P7.1@168,107.38 166.38,109 160.78,109 ; 139,109 143.98,109 ; 143.98,109 149.58,109 ; 149.58,109 155.18,109 ; 155.18,109 160.78,109
PCLKT4_0: M4.J8_14 P2.3 P3.3 P4.3 P5.3 P6.3 P7.3 P17.1 | length 44
  Bottom Layer w0.35: M4.J8_14@133.436,107.38 136.62,107.38 137.97,106.03 138.81,106.03 ; P2.3@140,104.84 138.81,106.03 ; P3.3@145.6,104.84 144.41,106.03 ; P4.3@151.2,104.84 150.01,106.03 150,106.03 ; P5.3@156.8,104.84 156.8,104.98 155.75,106.03 ; P6.3@162.4,104.84 162.4,104.91 161.28,106.03 ; P7.3@168,104.84 166.81,106.03 161.28,106.03 ; 138.81,106.03 144.41,106.03 ; 144.41,106.03 150,106.03 ; 150,106.03 155.75,106.03 ; 155.75,106.03 161.28,106.03
R\D\: IC1.32 U1.8
R\D\_3v: IC2.37 IC3.37 M4.J8_20 M5.J2_18 P17.4 P22.5 P26.12 P28.12 U1.16 U10.2
R\D\_BIOS1: IC4.24 P26.11
R\D\_BIOS2: IC5.24 P28.11
R_GPLLT_IN: M4.J4_35 P2.13 P3.13 P4.13 P5.13 P6.13 P7.13 P14.14 | length 128.1
  Bottom Layer w0.35: M4.J4_35@71.46,79.44 72.809,78.091 104.659,78.091 110.75,72 134.5,72 137,74.5 137,89.14 138.36,90.5 ; P2.13@140,92.14 138.36,90.5 ; P3.13@145.6,92.14 143.96,90.5 ; P4.13@151.2,92.14 149.56,90.5 ; P5.13@156.8,92.14 155.16,90.5 ; P6.13@162.4,92.14 160.76,90.5 ; P7.13@168,92.14 166.36,90.5 160.76,90.5 ; 138.36,90.5 143.96,90.5 ; 143.96,90.5 149.56,90.5 ; 149.56,90.5 155.16,90.5 ; 155.16,90.5 160.76,90.5
RAM_C\E\_high_byte: IC2.8 M4.J6_35 P19.14 P22.1 U8.11
RAM_C\E\_low_byte: IC3.8 M4.J6_38 P21.11 P22.2 U8.13
READY: IC1.22 U5.3
READY_3v: P8.6 U5.21 U10.13
stm32f411_buzzer: P33.5 P39.4
stm32h750_buzzer: M5.J3_24 P33.3
stm32h750_NOR_FLASH_CS: M5.J3_10 P35.1 P36.1
stm32h750_NOR_FLASH_WP: M5.J2_36 P35.5 P36.5
stm32h750_SPI_MISO: M5.J3_8 P35.3 P36.3
stm32h750_SPI_MOSI: M5.J3_7 P35.7 P36.7
stm32h750_SPI_SCK: M5.J3_9 P35.9 P36.9
Vdd_3.3V: C6.1 C7.1 C10.2 C11.2 C12.2 C13.2 C14.2 C28.2 C29.2 C30.2 C31.2 C40.2 C41.2 C42.2 C43.2 C44.2 C45.2 C46.2 C47.2 C48.2 C49.2 C50.2 C51.2 C52.2 C53.2 C54.2 C55.2 C56.2 C57.2 C58.2 C59.2 C60.2 C61.2 C62.2 C63.2 C64.2 C65.2 C78.2 C79.2 C80.2 C81.2 C90.2 C91.2 IC2.11 IC2.33 IC3.11 IC3.33 IC10.8 IC11.8 M2.3 P16.14 P17.14 P20.10 P21.14 P27.3 P27.5 P29.3 P29.5 P37.1 P37.2 R2.2 R118.1 R119.1 R120.1 R121.1 S1.3 S2.3 S3.1 S4.1 S5.3 S6.3 S7.1 S8.1 S9.3 S10.3 S11.1 S12.1 S13.3 S14.3 S15.1 S16.1 S17.3 S18.3 S19.1 S20.1 S21.3 S22.3 S23.1 S24.1 S25.3 S26.3 S27.1 S28.1 S29.3 S30.3 S31.1 S32.1 S33.4 SJ1.1 U1.23 U1.24 U2.23 U2.24 U3.23 U3.24 U4.23 U4.24 U5.23 U5.24 U6.20 U7.20 U8.20 U9.20 U10.20 U11.20 U12.20 U13.20 U14.20 U15.20 U16.20 U17.20 X1.1 X1.4 X2.1 X2.4 X3.1 X3.4 X4.1 X4.4 X5.1 X5.4 | length 53.3
  Top Layer w0.254: C90.2@90.496,19.752 C91.2@90.496,18.179 90.6,18.075 S33.4@90.6,15.025 90.6,13.725 91.1,13.225 94.9,13.225 98,16.325 SJ1.1@98,17.175
  Top Layer w0.5: C10.2@144.44,115.175 144.475,115.14 144.475,113.44 X1.1@144.74,113.175 X1.4@144.74,111.475 ; C12.2@150.04,115.175 150.075,115.14 150.075,113.44 X2.1@150.34,113.175 X2.4@150.34,111.475 ; C13.2@155.64,115.175 155.65,115.165 155.65,113.465 X3.1@155.94,113.175 X3.4@155.94,111.475 ; C14.2@161.24,115.175 161.25,115.165 161.25,113.465 X4.1@161.54,113.175 X4.4@161.54,111.475 ; C11.2@166.84,115.175 166.85,115.165 166.85,113.465 X5.1@167.14,113.175 X5.4@167.14,111.475
  Top Layer w1: P20.10@1.524,105.504 7.254,105.504 12.685,110.935 P37.2@15.131,110.935 P37.1@15.131,113.475
VDD_3.3V_BIOS1: C66.2 C67.2 C68.2 C69.2 C70.2 IC4.32 P27.6
VDD_3.3V_BIOS2: C71.2 C72.2 C73.2 C74.2 C75.2 IC5.32 P29.6
Vdd_5V: C1.1 C2.1 C15.2 C16.2 C17.2 C18.2 C19.2 C20.2 C21.2 C22.1 C23.1 C24.1 C25.1 C26.1 C27.1 C32.2 C33.2 C34.2 C35.2 C36.2 C37.2 C38.2 C39.2 C76.2 C77.1 C82.2 C83.2 C84.2 C85.2 C86.2 C87.2 C88.2 C89.2 IC1.23 IC1.33 IC1.40 LS1.1 M1.3 M5.J2_1 M5.J2_2 M6.18 M6.40 P16.13 P17.13 P20.9 P21.13 R1.2 U1.1 U1.2 U2.1 U3.1 U3.2 U4.1 U5.1
Vdd_5V_LCD: C8.1 C9.1 M3.3 P37.3 P37.4 R3.2 | length 2.5
  Top Layer w1: P37.4@15.131,105.855 P37.3@15.131,108.395
W\E\_BIOS1: IC4.31 P27.4
W\E\_BIOS2: IC5.31 P29.4
W\R\: IC1.29 U1.9
W\R\_3v: IC2.15 IC3.15 M4.J8_26 M5.J2_17 P17.6 P22.6 U1.15 U10.4
pads on no net: IC1.26 IC1.27 IC1.30 IC1.31 IC2.1 IC2.2 IC2.21 IC2.22 IC2.23 IC2.24 IC2.25 IC2.42 IC2.43 IC2.44 IC3.1 IC3.2 IC3.21 IC3.22 IC3.23 IC3.24 IC3.25 IC3.42 IC3.43 IC3.44 IC10.7 IC11.7 M4.J3_1 M4.J3_2 M4.J3_3 M4.J3_4 M4.J3_14 M4.J4_1 M4.J4_2 M4.J6_1 M4.J6_2 M4.J8_1 M4.J8_2 M4.J8_40 M5.J2_3 M5.J2_4 M5.J2_21 M5.J2_24 M5.J3_1 M5.J3_2 M5.J3_5 M5.J3_6 M5.J4_1 M5.J4_2 M5.J4_3 M5.J4_4 M5.J4_5 M5.J4_6 M5.J4_7 M5.J4_8 M6.8 M6.9 M6.20 M6.21 M6.25 M6.38 S1.2 S1.4 S2.2 S2.4 S3. S3.3 S4. S4.3 S5.2 S5.4 S6.2 S6.4 S7. S7.3 S8. S8.3 S9.2 S9.4 S10.2 S10.4 S11. S11.3 S12. S12.3 S13.2 S13.4 S14.2 S14.4 S15. S15.3 S16. S16.3 S17.2 S17.4 S18.2 S18.4 S19. S19.3 S20. S20.3 S21.2 S21.4 S22.2 S22.4 S23. S23.3 S24. S24.3 S25.2 S25.4 S26.2 S26.4 S27. S27.3 S28. S28.3 S29.2 S29.4 S30.2 S30.4 S31. S31.3 S32. S32.3 S33.0 S33.1 S33.8 U3.14 U3.15 U3.16 U3.17 U3.18 U3.19 U5.8 U5.9 U5.10

## Polygon pours and split planes (outlines as drawn)
GND on Top Layer "GND_L01_P000" (solid, pour order 0): 0,0 0,191 200,191 200,0
GND on Bottom Layer "GND_L02_P001" (solid, pour order 1): 0,0 0,191 200,191 200,0

## Silkscreen, mask and mechanical layers (free items; w line width, h text height)
Mechanical 1:
  the board outline again, w0.254

## Text inside footprints (layer, text, board x,y; h text height)
C1: Top Overlay "+" at 372.48,296.506 h1
C3: Top Overlay "+" at 325.744,296.506 h1
C6: Top Overlay "+" at 279.008,296.506 h1
C8: Top Overlay "+" at 237.352,296.506 h1
IC4: Top Overlay "1" at 376.375,161.755 h1.2
IC5: Top Overlay "1" at 307.411,162.027 h1.2
IC6: Top Overlay "1" at 534.76,334.146 h1.52 r90; Top Overlay "6" at 534.76,346.592 h1.52 r90; Top Overlay "7" at 524.03,346.604 h1.52 r90; Top Overlay "12" at 524.03,333.257 h1.52 r90
IC7: Top Overlay "1" at 555.08,334.146 h1.52 r90; Top Overlay "6" at 555.08,346.592 h1.52 r90; Top Overlay "7" at 544.35,346.604 h1.52 r90; Top Overlay "12" at 544.35,333.257 h1.52 r90
IC8: Top Overlay "1" at 368.056,334.336 h1.52 r90; Top Overlay "6" at 368.056,346.782 h1.52 r90; Top Overlay "7" at 357.326,346.794 h1.52 r90; Top Overlay "12" at 357.326,333.447 h1.52 r90
IC9: Top Overlay "1" at 389.296,333.796 h1.52 r90; Top Overlay "6" at 389.296,346.242 h1.52 r90; Top Overlay "7" at 378.566,346.254 h1.52 r90; Top Overlay "12" at 378.566,332.907 h1.52 r90
M1: Top Overlay "OUT-" at 396.64,292.543 h1; Top Overlay "IN+" at 384.765,307.718 h1; Top Overlay "OUT+" at 384.79,292.543 h1; Top Overlay "IN-" at 397.903,307.718 h1
M2: Top Overlay "OUT-" at 303.168,292.543 h1; Top Overlay "IN+" at 291.293,307.718 h1; Top Overlay "OUT+" at 291.318,292.543 h1; Top Overlay "IN-" at 304.431,307.718 h1
M3: Top Overlay "OUT-" at 261.512,292.543 h1; Top Overlay "IN+" at 249.637,307.718 h1; Top Overlay "OUT+" at 249.662,292.543 h1; Top Overlay "IN-" at 262.775,307.718 h1
M4: Top Overlay "MatchXO3LF Starter Kit" at 82.53,103.124 h1.52; Top Overlay "LMXO3LF-6900C" at 88.624,99.624 h1.52; Top Overlay "6BG256C" at 93.195,96.124 h1.52; Top Overlay "USB" at 98.28,67.874 h1.52; Top Overlay "J3" at 62.265,124.373 h1.52; Top Overlay "J4" at 71.46,124.373 h1.52; Top Overlay "J6" at 121.777,124.373 h1.52; Top Overlay "J8" at 130.896,124.373 h1.52
M5: Top Overlay "J4" at 20.955,5.82 h1.52 r180; Top Overlay "Module DevEBox" at 40.047,30.066 h1.52 r180; Top Overlay "V2.0" at 40.047,34.066 h1.52 r180; Top Overlay "SN: 1907" at 40.047,36.066 h1.52 r180; Top Overlay "STM32H7XX_M" at 40.047,32.062 h1.52 r180; Top Overlay "USB" at 41.702,3.066 h1.52 r180; Top Overlay "microSD" at 41.202,65.066 h1.52 r180; Top Overlay "J3" at 13.205,6.32 h1.52 r180; Top Overlay "J2" at 48.705,6.32 h1.52 r180
P1: Top Overlay "43" at 37.281,72.195 h1.27; Top Overlay "44" at 45.381,72.195 h1.27; Top Overlay "1" at 38.731,125.605 h1.27; Top Overlay "2" at 45.381,125.605 h1.27
P2: Top Overlay "1" at 139.775,109.125 h1.27; Top Overlay "2" at 142.125,109.125 h1.27
P3: Top Overlay "1" at 145.4,109.125 h1.27; Top Overlay "2" at 147.7,109.125 h1.27
P4: Top Overlay "1" at 151,109.125 h1.27; Top Overlay "2" at 153.3,109.125 h1.27
P5: Top Overlay "1" at 156.6,109.125 h1.27; Top Overlay "2" at 158.925,109.125 h1.27
P6: Top Overlay "2" at 164.525,109.125 h1.27; Top Overlay "1" at 162.175,109.125 h1.27
P7: Top Overlay "1" at 167.8,109.125 h1.27; Top Overlay "2" at 170.1,109.125 h1.27
P8: Top Overlay "2" at 145.075,84.825 h1.27; Top Overlay "1" at 142.75,84.825 h1.27
P9: Top Overlay "2" at 155.05,84.825 h1.27; Top Overlay "1" at 152.725,84.825 h1.27
P26: Top Overlay "2" at 320.824,171.91 h1.27 r90; Top Overlay "1" at 323.364,171.91 h1.27 r90; Top Overlay "31" at 323.364,214.074 h1.27 r90; Top Overlay "32" at 320.824,214.074 h1.27 r90
P27: Top Overlay "2" at 314.22,171.91 h1.27 r90; Top Overlay "1" at 316.76,171.91 h1.27 r90; Top Overlay "31" at 316.76,214.074 h1.27 r90; Top Overlay "32" at 314.22,214.074 h1.27 r90
P28: Top Overlay "2" at 271.64,157.778 h1.27 r90; Top Overlay "1" at 274.18,157.778 h1.27 r90; Top Overlay "31" at 274.18,199.942 h1.27 r90; Top Overlay "32" at 271.64,199.942 h1.27 r90
P29: Top Overlay "2" at 248.78,159.81 h1.27 r90; Top Overlay "1" at 251.32,159.81 h1.27 r90; Top Overlay "31" at 251.32,201.974 h1.27 r90; Top Overlay "32" at 248.78,201.974 h1.27 r90
P30: Top Overlay "2" at 502.168,264.55 h1.27 r90; Top Overlay "1" at 504.708,264.55 h1.27 r90; Top Overlay "31" at 504.708,306.714 h1.27 r90; Top Overlay "32" at 502.168,306.714 h1.27 r90
P31: Top Overlay "2" at 412.252,315.858 h1.27 r90; Top Overlay "1" at 414.792,315.858 h1.27 r90; Top Overlay "15" at 414.792,337.702 h1.27 r90; Top Overlay "16" at 412.252,337.702 h1.27 r90
P32: Top Overlay "2" at 222.718,315.3 h1.27 r90; Top Overlay "1" at 225.258,315.3 h1.27 r90; Top Overlay "15" at 225.258,337.144 h1.27 r90; Top Overlay "16" at 222.718,337.144 h1.27 r90
P33: Top Overlay "6" at 296.394,36.488 h1.27 r90; Top Overlay "5" at 298.934,36.488 h1.27 r90; Top Overlay "2" at 296.394,27.344 h1.27 r90; Top Overlay "1" at 298.934,27.852 h1.27 r90
P35: Top Overlay "10" at 272.552,255.406 h1.27 r90; Top Overlay "9" at 275.092,255.406 h1.27 r90; Top Overlay "1" at 275.092,241.69 h1.27 r90; Top Overlay "2" at 272.552,241.182 h1.27 r90
P36: Top Overlay "10" at 234.452,255.406 h1.27 r90; Top Overlay "9" at 236.992,255.406 h1.27 r90; Top Overlay "1" at 236.992,241.69 h1.27 r90; Top Overlay "2" at 234.452,241.182 h1.27 r90
P38: Top Overlay "43" at 23.271,72.145 h1.27; Top Overlay "44" at 31.421,72.145 h1.27; Top Overlay "1" at 24.671,125.645 h1.27; Top Overlay "2" at 31.421,125.645 h1.27
P39: Top Overlay "1" at 313.7,344.306 h1.27 r90; Top Overlay "2" at 311.16,343.798 h1.27 r90; Top Overlay "4" at 311.16,350.402 h1.27 r90; Top Overlay "3" at 313.7,350.402 h1.27 r90
U1: Top Overlay "*" at 315.336,97.628 h1.27
U2: Top Overlay "*" at 109.128,155.413 h1.27 r270
U3: Top Overlay "*" at 345.394,97.441 h1.27
U4: Top Overlay "*" at 336.758,97.441 h1.27
U5: Top Overlay "*" at 328.122,97.441 h1.27